# Altium PCB PCB_SPSU-v6.0.0.PcbDoc
Units mil, origin at the board's own origin, x right, y up, seen from the top; angles counter-clockwise.
Board outline 1757.74 x 2141.82 mil, 2 copper layers (Top Layer, Bottom Layer), stack 61.811 mil thick; 29 components, 18 nets, 100 pads, 208 vias.
Unrouted connection lines stored in the file: 4.
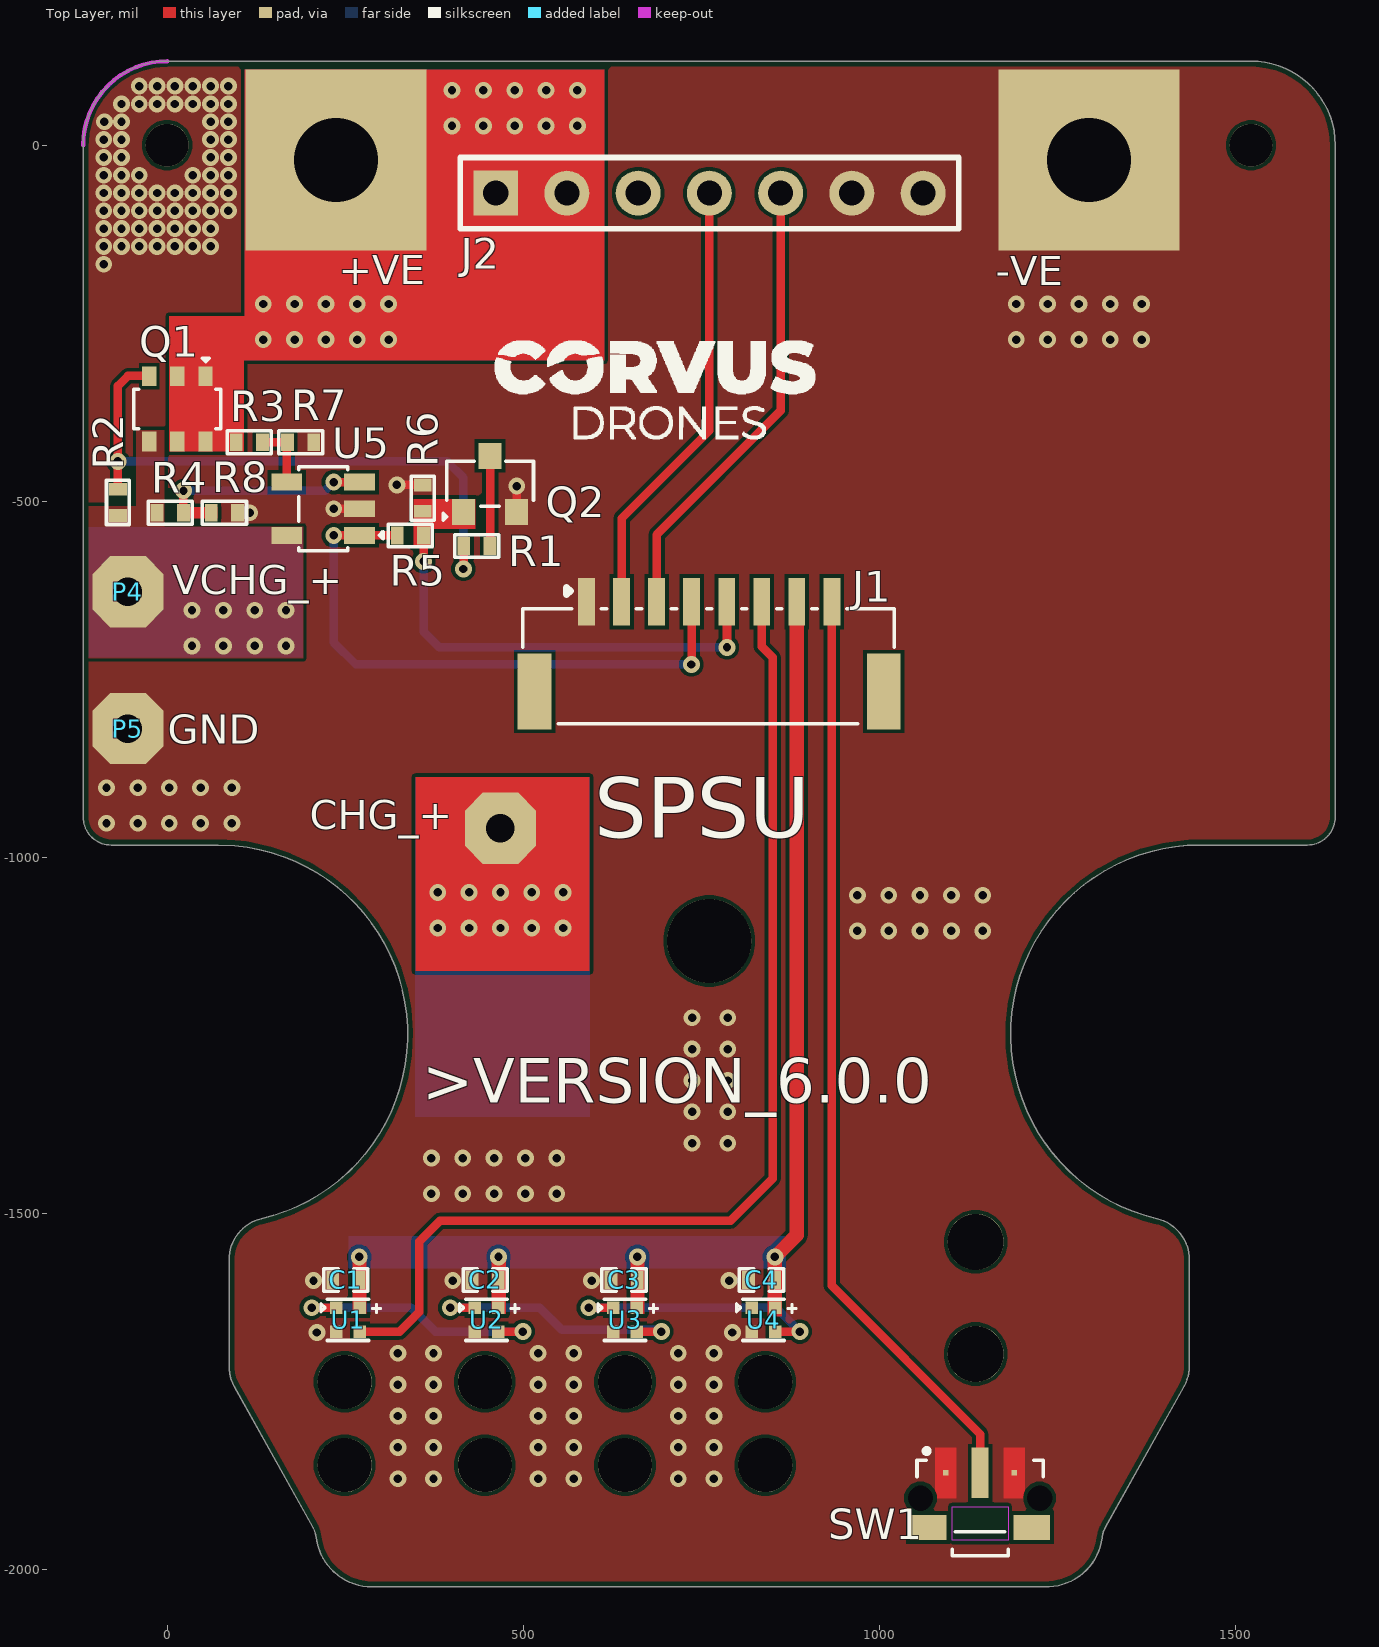
[diagram p0: Top Layer view]
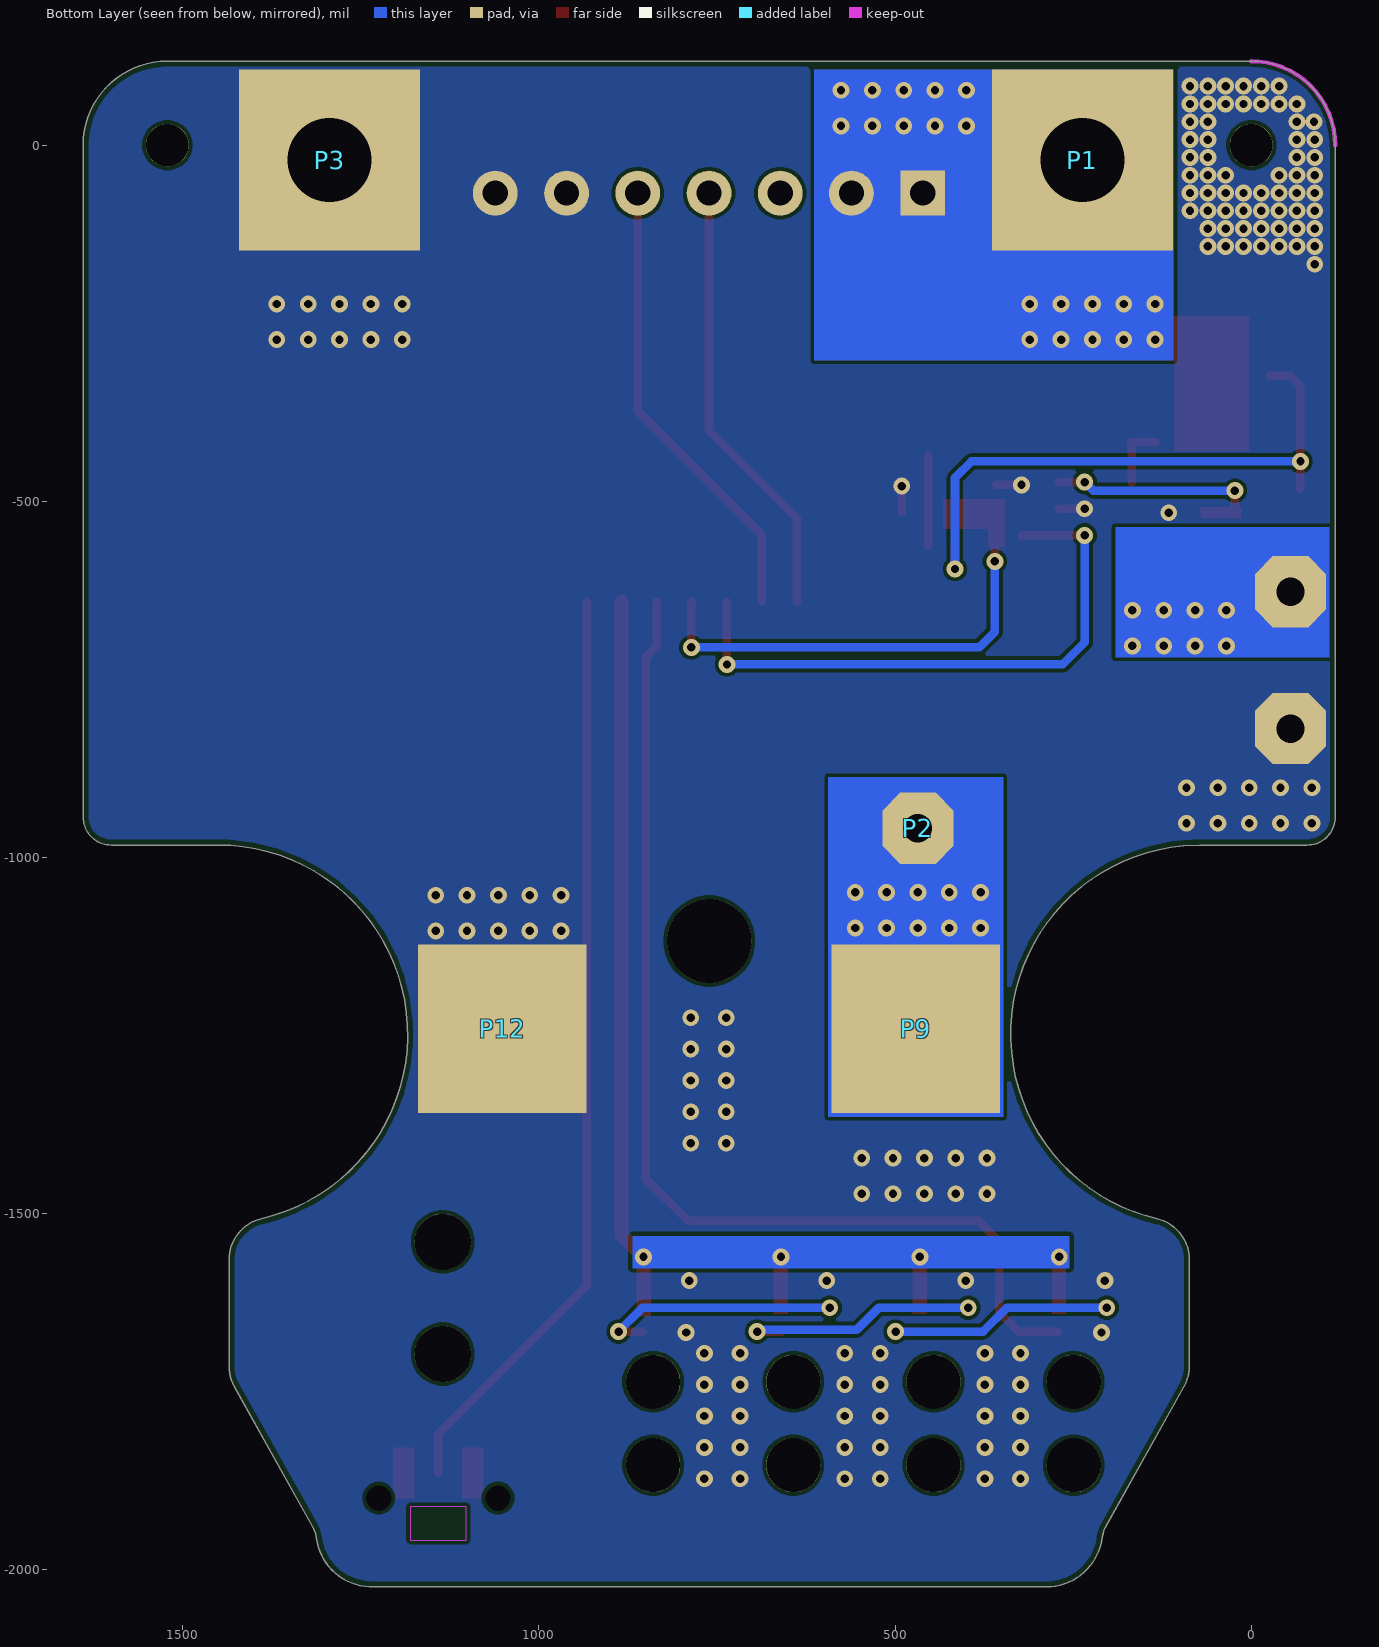
[diagram p1: Bottom Layer view, seen from below]
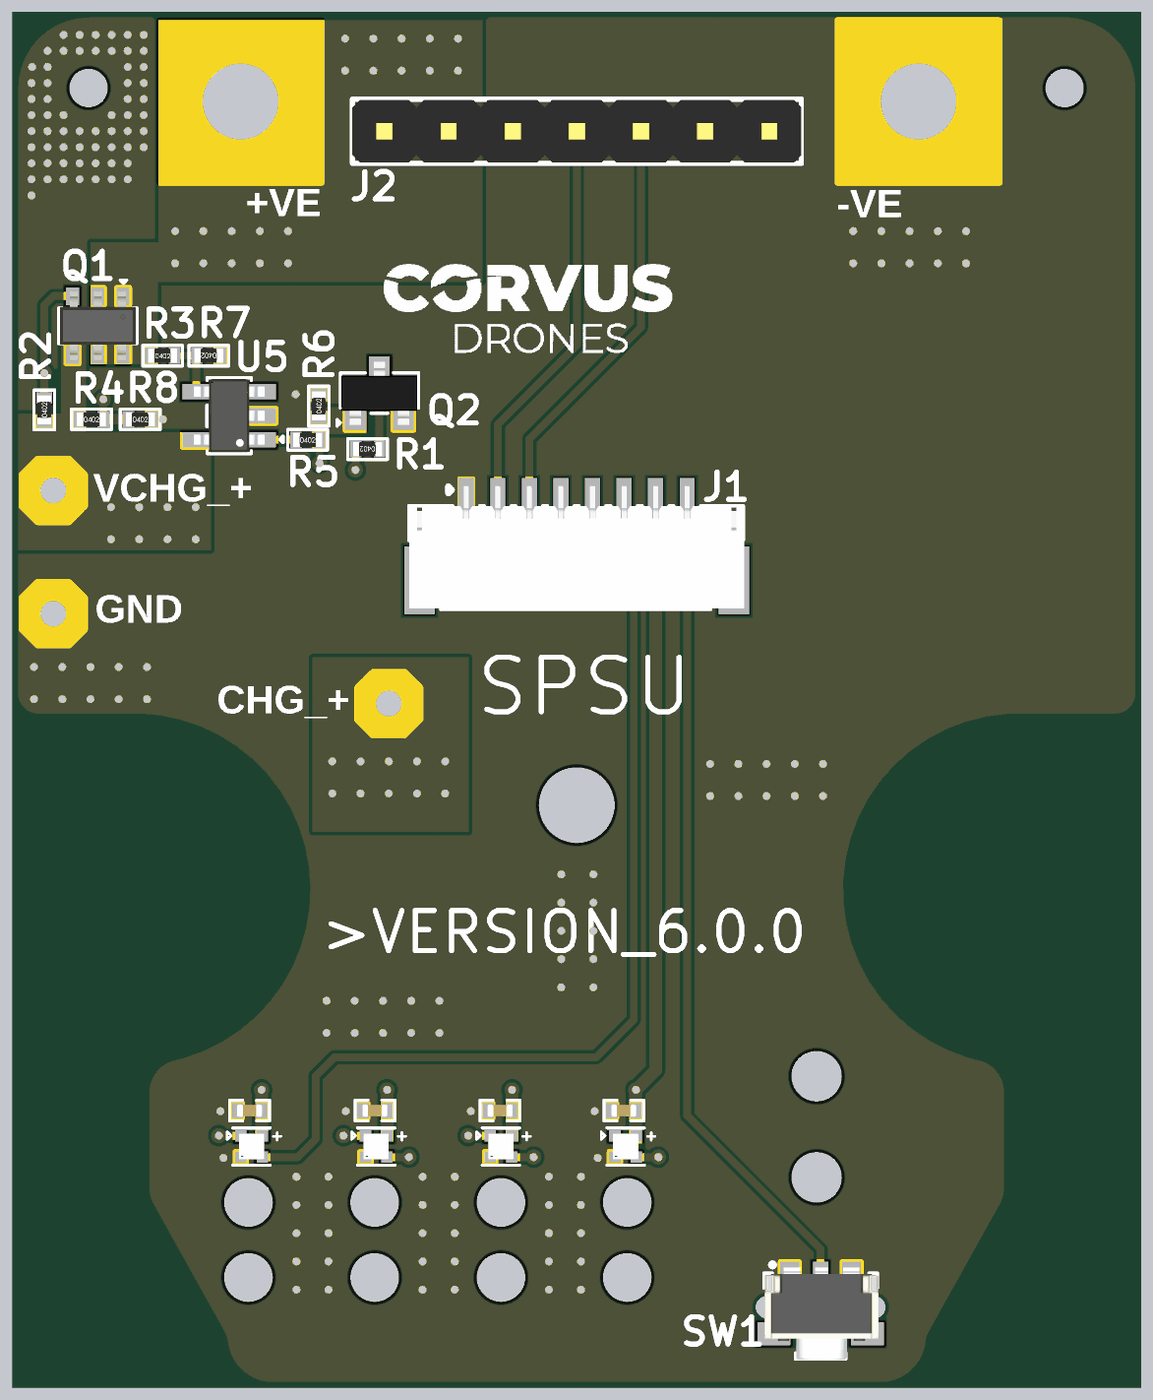
[diagram p2: 3D render of the assembled board from above, using the file's embedded part models]

## Layer stack, top to bottom
Top Solder: solder mask 0.3937, Solder Resist, Dk 3.5
Top Layer: signal copper 1.378
Dielectric 1: core 59.0551, FR-4, Dk 4.8
Bottom Layer: signal copper 1.378
Bottom Solder: solder mask 0.3937, Solder Resist, Dk 3.5

## Board outline
204.87,-1940.69 94.44,-1742.51 cw(c146.03,-1713.76) 86.97,-1713.76 86.97,-1564.54 cw(c146.02,-1564.54) 132.57,-1507.04 ccw(c72.05,-1248.28) 95.21,-983.54 72.05,-982.52 -78.47,-982.52 cw(c-78.47,-943.15) -117.84,-943.15 -117.84,-0.15 cw(c0.27,-0.14) -10.03,117.52 0.27,117.96 1521.79,117.96 cw(c1521.8,-0.15) 1639.46,10.15 1639.9,-0.15 1639.9,-943.15 cw(c1600.53,-943.15) 1603.97,-982.37 1600.53,-982.52 1450.01,-982.52 ccw(c1450.01,-1248.27) 1389.49,-1507.04 cw(c1376.04,-1564.54) 1435.09,-1564.54 1435.09,-1713.76 cw(c1376.03,-1713.76) 1427.62,-1742.51 1317.19,-1940.69 ccw(c1351.56,-1959.88) 1314.38,-1946.95 1313.4,-1950.24 1312.71,-1953.6 1312.52,-1954.94 cw(c1234.4,-1945.12) 1238.29,-2023.76 1234.39,-2023.86 287.67,-2023.86 cw(c287.67,-1945.12) 211.61,-1965.5 210.12,-1958.8 209.54,-1954.94 208.1,-1948.23 206.94,-1945 205.51,-1941.88

## Design rules (kind name [scope] priority, off if disabled: settings)
BoardOutlineClearance mdCopperDimension [All] p1: gap=10 ignorepadtopadclearanceinfootprint=FALSE except(0: Arc-SplitContinuation Track-SplitContinuation SMDPad-SplitContinuation THPad-SplitContinuation Via-SplitContinuation Fill-SplitContinuation Poly-SplitContinuation Region-SplitContinuation Text-SplitContinuation; 1: Arc-OutlineEdge Fill-OutlineEdge Text-OutlineEdge; 5: Track-OutlineEdge; 7.87: Poly-OutlineEdge Poly-CavityEdge Poly-CutoutEdge Poly-SplitBarrior)
Clearance [All] p1: gap=5 ignorepadtopadclearanceinfootprint=FALSE
HoleSize [All] p1: absolutevalues=TRUE maxlimit=99999 minlimit=11.8 maxpercent=80.000 minpercent=20.000
HoleToHoleClearance [All] p1: gap=6 allowstackedmicrovias=TRUE
MinimumSolderMaskSliver [All] p1: minsoldermaskwidth=0
PolygonConnect [All] p1: connectstyle=Direct reliefconductorwidth=10 reliefentries=4 polygonreliefangle="90 Angle" airgapwidth=10
RoutingVias [All] p1: holewidth=11.81 width=23.62 viastyle="Through Hole" minholewidth=11.81 minwidth=23.62 maxholewidth=100 maxwidth=100
SilkToSilkClearance [All] p1: silktosilkclearance=3
SilkToSolderMaskClearance [IsPad] p1: minsilkscreentomaskgap=0 clearancetoexposedcopper=TRUE
SolderMaskExpansion [All] p1: expansion=4 istentingtop=FALSE
UnRoutedNet [All] p1: checkbadconnections=TRUE
Width [All] p1: maxlimit=100 minlimit=5 preferedwidth=12 minimp=50.000000 maximp=50.000000 favimp=50.000000
24 further rules are at their usual default settings.

## Classes and differential pairs
component class "U_HMI Led's_Sheet": C1 C2 C3 C4 U1 U2 U3 U4
component class U_Power_Sheet: J1 J2 P1 P2 P3 P4 P5 P9 P12 Q1 Q2 R1 R2 R3 R4 R5 R6 R7 R8 SW1 U5

## Components (designator, comment, footprint, x,y, rotation, side; value= is the part's Value field where it differs from the comment)
C1 "100nF" cap-0402 251,-1593 r180 top
C2 "100nF" cap-0402 446.5,-1593 r180 top
C3 "100nF" cap-0402 641.5,-1593 r180 top
C4 "100nF" cap-0402 834.5,-1593 r180 top
J1 "SM08B-GHS-TB(LF)(SN)" SM08B-GHS-TB(LF)(SN) 761,-704 r0 top
J2 "PZ254V-11-07P" "HDR 1X7" 461.3,-67.31 r90 top locked
P1 "THT-Pad 6.5mm_3mm" "THT-Pad 6.5mm/Hole Size 3mm" 237,-21 r90 bottom
P2 "Wirepad 2.54/1.0" "Wirepad 2.54/1.0" 468,-959 r90 bottom
P3 "THT-Pad 6.5mm_3mm" "THT-Pad 6.5mm/Hole Size 3mm" 1294,-21 r90 bottom
P4 "Wirepad 2.54/1.0" "Wirepad 2.54/1.0" -55,-627 r180 top
P5 "Wirepad 2.54/1.0" "Wirepad 2.54/1.0" -55,-819 r180 top
P9 "SMD-Pad6mm" "6.0MM-SMD PAD" 471.02,-1240.44 r180 bottom locked
P12 "SMD-Pad6mm" "6.0MM-SMD PAD" 1051.58,-1240.44 r180 bottom locked
Q1 "IRLTS2242TRPBF" 6-TSOP_ 14.41,-370.23 r270 top value=55MR
Q2 "2N7002KT1G" SOT-23 453.4,-475.63 r0 top
R1 "10K" Res-0402 434.9,-562.6 r180 top
R2 "100K" Res-0402 -69,-501.5 r90 top
R3 "100K" Res-0402 115.5,-417 r0 top
R4 "100K" Res-0402 4.5,-516 r0 top
R5 "100K" Res-0402 341.5,-548 r0 top
R6 "100K" Res-0402 359,-495.5 r90 top
R7 "97.6K" Res-0402 187.5,-417 r180 top
R8 "100K" Res-0402 80.5,-516 r0 top
SW1 "TL3340AF160QG" TL3340AF160QG 1141.3,-1902.31 r0 top
U1 "XL-1010RGBC-WS2812B" XL-1010RGBC-WS2812B 254,-1649 r0 top
U2 "XL-1010RGBC-WS2812B" XL-1010RGBC-WS2812B 448.42,-1649 r0 top
U3 "XL-1010RGBC-WS2812B" XL-1010RGBC-WS2812B 642.85,-1649 r0 top
U4 "XL-1010RGBC-WS2812B" XL-1010RGBC-WS2812B 837.27,-1649 r0 top
U5 "TLV271IDBVR" SOT-23-5 219.18,-510.4 r180 top

## Footprints (in the part's own frame and the unit in brackets; to place one, negate y for a bottom-side part, rotate by r counter-clockwise, add the part's x,y. Pads: shape width x height; smd on the part's side, far side on the other; paste and mask are expansions set on the pad)
6-TSOP_ [mil]
  rect 27.52x20 smd: 1(-45.77,39.41) 2(-45.77,0) 3(-45.77,-39.41) 4(45.77,-39.41) 5(45.77,0) 6(45.77,39.41)
  silkscreen extent -71,-61 28,61, body extent -53,-59 53,59, height 39
"6.0MM-SMD PAD" [mm]
  rect 6x6 smd: 1(0,0)
cap-0402 [mil]
  rect 18x25 smd mask+2.36: 1(-18.5,0) 2(18.5,0)
  silkscreen extent -31,-16 31,16, body extent -20,-10 20,10, height 19
"HDR 1X7" [mm]
  rect 1.6x1.6 hole 0.9: 1(0,0)
  round 1.6 hole 0.9: 2(0,-2.54) 3(0,-5.08) 4(0,-7.62) 5(0,-10.16) 6(0,-12.7) 7(0,-15.24)
  silkscreen extent -1.27,-16.51 1.27,1.27, body extent -1.24,-16.51 1.25,1.27, height 8.74
Res-0402 [mil]
  rect 18x25 smd mask+2.17: 1(-18.5,0) 2(18.5,0)
  silkscreen extent -32,-17 32,16, body extent -23,-11 23,11, height 16
SM08B-GHS-TB(LF)(SN) [mm]
  rect 0.6x1.7 smd paste+0 mask+0.05: 1(-4.375,1.6) 2(-3.125,1.6) 3(-1.875,1.6) 4(-0.625,1.6) 5(0.625,1.6) 6(1.875,1.6) 7(3.125,1.6) 8(4.375,1.6)
  rect 1.21x2.7 smd paste+0 mask+0.05: MP1(-6.225,-1.6) MP2(6.225,-1.6)
  silkscreen extent -6.65,-2.75 6.6,2.11, body extent -6.63,-2.7 6.63,2.15, height 4.35
SOT-23 [mm] "TRANS NPN 40V 0.6A SOT23"
  rect 0.82x0.92 smd: 1(-0.95,-1) 2(0.95,-1) 3(0,1)
  silkscreen extent -1.68,-1.3 1.55,0.81, body extent -1.5,-1.25 1.5,1.25, height 1.05
SOT-23-5 [mm]
  rect 1.1x0.6 smd: 1(-1.3,0.95) 2(-1.3,0) 3(-1.3,-0.95) 4(1.3,-0.95) 5(1.3,0.95)
  silkscreen extent -2.13,-1.5 0.88,1.5, body extent -1.4,-1.45 1.4,1.45, height 1.45
"THT-Pad 6.5mm/Hole Size 3mm" [mil]
  rect 254x254 hole 118.11: 1(0,0)
TL3340AF160QG [mm]
  rect 0.2x0.2 smd paste-1 mask+0: 1(-1.225,0.975) 1(-1.225,0.975) 3(1.225,0.975) 3(1.225,0.975)
  rect 0.6x1.8 smd: 2(0,0.975)
  rect 1.3x0.9 smd: S1(-1.85,-0.975) S2(1.85,-0.975)
  round 0 hole 0.9 unplated: ""(-2.125,0.075) ""(2.125,0.075)
  Top Layer region: -0.85,0.075 -1.525,0.075 -1.525,0.084 -1.525,0.102 -1.526,0.12 -1.529,0.138 -1.53,0.146 -1.53,0.146 -1.531,0.155 -1.533,0.173 -1.536,0.191 -1.54,0.209 -1.543,0.218 -1.545,0.228 -1.551,0.25 -1.557,0.271 -1.565,0.292 -1.569,0.302 -1.572,0.311 -1.579,0.327 -1.587,0.343 -1.595,0.358 -1.6,0.365 -1.6,0.375 -1.6,1.875 -0.85,1.875
  Top Layer region: 1.6,0.375 1.6,0.365 1.595,0.358 1.587,0.343 1.579,0.327 1.572,0.311 1.569,0.302 1.565,0.292 1.557,0.271 1.551,0.25 1.545,0.228 1.543,0.218 1.54,0.209 1.536,0.191 1.533,0.173 1.531,0.155 1.53,0.146 1.53,0.146 1.529,0.138 1.526,0.12 1.525,0.102 1.525,0.084 1.525,0.075 0.85,0.075 0.85,1.875 1.6,1.875
  Keep-Out Layer region: 1,-1.425 -1,-1.425 -1,-0.225 1,-0.225
  silkscreen extent -2.25,-1.97 2.25,1.8, body extent -2.21,-2.01 2.29,1.65, height 3.21
"Wirepad 2.54/1.0" [mil]
  oct 100x100 hole 40: 1(0,0)
XL-1010RGBC-WS2812B [mm]
  rect 0.45x0.45 smd: 1(-0.425,0.425) 2(0.425,0.425) 3(-0.425,-0.425) 4(0.425,-0.425)
  silkscreen extent -0.97,-0.74 1.17,0.74, body extent -0.5,-0.5 0.5,0.5, height 0.81

## Part data
C1 C2 C3 C4: library part C1005X7R1H104KT000F, "CAP CER 0.1UF 50V X7R 0402", Dielectric=X7R, LCSC Part Number=C361198, MAnufacturer=TDK, Tolerance=10%, Voltage=25V, Category="Ceramic Capacitors", ComponentLink1Description=LCSC, ComponentLink1URL=https://www.lcsc.com/product-detail/Multilayer-Ceramic-Capacitors-MLCC-SMD-SMT_TDK-C1005X7R1H104KT000F_C361198.html, Item Type=Capacitor, Manufacturer Part Number=C1005X7R1H104KT000F, RoHS=No, Supplier 1=Avnet, Supplier Part Number 1=C1005X7R1H104KT000F
J1: "CONN HEADER SMD R/A 8POS 1.25MM", Current Rating=1A, Flammability Rating="UL94 V-0", Housing Color=50Colour, Insulation Color=Natural, LCSC Part Number=C265111, MAnufacturer=JST, Voltage Rating=50V, ComponentLink1Description=https://datasheet.ciiva.com/25617/0900766b810cef18-25617249.pdf?src-supplier=Rs, ComponentLink1URL=https://datasheet.ciiva.com/25617/0900766b810cef18-25617249.pdf?src-supplier=Rs, ComponentLink2Description=https://datasheet.ciiva.com/16290/jst20sm08b-ghs-tb-lf-sn-16290511.pdf?src-supplier=Future+Electronics, ComponentLink2URL=https://datasheet.ciiva.com/16290/jst20sm08b-ghs-tb-lf-sn-16290511.pdf?src-supplier=Future+Electronics, Connector type=Header, Contact Finish - Mating=TIN, Contact Material=Bronze, Contact Shape=Rectangular, Contact Type="Outer Shroud Contact", Fastening Type=Ramp, Housing Material=4261ConductorMaterial, Insulation Material=Nylon, Item Type=Connectors, Lead Free=5697LeadFree, Manufacturer Part Number=SM08B-GHS-TB(LF)(SN), Mounting Technology="Surface Mount", Number of Contacts=8, Number of Positions=8, Number of Rows=1, Orientation="Right Angle", Packaging="Cut Tape", Pitch=1.25mm, Pricing="2500=0.3128, 5000=0.3063 (USD)", RoHS=Yes, Series=GH, Stock=5000, Supplier="Arrow Electronics", Termination=Solder
J2: "DNP", LCSC Part Number=C492406, MAnufacturer=XFCN, Package=2.54mm, ComponentLink1Description=LCSC, ComponentLink1URL=https://www.lcsc.com/product-detail/Pin-Headers_XFCN-PZ254V-11-07P_C492406.html, Item Type=Header, Manufacturer Part Number=PZ254V-11-07P
P1 P3: library part "THT-Pad 6.5mm/Hole Size 3mm"
Q1: "MOSFET P-CH 20V 6.9A 6TSOP", Drain to Source Breakdown Voltage=-20V, Drain to Source Resistance=26mR, LCSC Part Number=C538190, MAnufacturer=Infineon, On-State Resistance=-32mR, Package Quantity=3000NUMBER, Power Dissipation=2W, ComponentLink1Description=http://www.farnell.com/datasheets/1911990.pdf?src-supplier=Farnell, ComponentLink1URL=http://www.farnell.com/datasheets/1911990.pdf?src-supplier=Farnell, ComponentLink2Description=http://www.farnell.com/datasheets/1911990.pdf?src-supplier=Element14, ComponentLink2URL=http://www.farnell.com/datasheets/1911990.pdf?src-supplier=Element14, ComponentLink3Description=https://datasheet.octopart.com/IRLTS2242TRPBF-Infineon-datasheet-41193307.pdf?src-supplier=Newark, ComponentLink3URL=https://datasheet.octopart.com/IRLTS2242TRPBF-Infineon-datasheet-41193307.pdf?src-supplier=Newark, ComponentLink4Description=https://www.infineon.com/dgdl/irlts2242pbf.pdf?fileId=5546d462533600a401535671e9a12718&src-supplier=Digikey, ComponentLink4URL=https://www.infineon.com/dgdl/irlts2242pbf.pdf?fileId=5546d462533600a401535671e9a12718&src-supplier=Digikey, ComponentLink5Description=https://datasheet.octopart.com/IRLTS2242TRPBF-Infineon-datasheet-11534477.pdf?src-supplier=Farnell, ComponentLink5URL=https://datasheet.octopart.com/IRLTS2242TRPBF-Infineon-datasheet-11534477.pdf?src-supplier=Farnell, Element Configuration=5460ElementConfiguration, Fall Time=68ns, Height=1.3mm, Item Type=MOSFETs, Length=3mm, Manufacturer Part Number=IRLTS2242TRPBF, Number of Channels=1NUMBER, Number of Elements=1NUMBER, Pricing="1=0.44, 10=0.372, 50=0.372, 100=0.259, 1000=0.164, 10000=0.129 (USD)", Radiation Hardening=5898YesNo, RoHS=Yes, Stock=67736, Supplier=Mouser, Turn-Off Delay Time=18ns, Turn-On Delay Time=5.8ns, Width=1.75mm
Q2: "MOSFET N-CH 60V 320MA SOT23-3", Case/Package=SOT-23-3, Continuous Drain Current (ID)=320mA, Drain to Source Breakdown Voltage=60V, Drain to Source Resistance=1.6R, Gate to Source Voltage (Vgs)=20V, Input Capacitance=24.5pF, LCSC Part Number=C116584, MAnufacturer="ON Semiconductor", Max Operating Temperature=150°C, Max Power Dissipation=420mW, Min Operating Temperature=-55°C, Package Quantity=1, Power Dissipation=300mW, Supplier Part Number=3445699, Threshold Voltage=2.3V, Category=MOSFETs, ComponentLink1Description=https://datasheet.ciiva.com/1254/2n7002k-d-1254499.pdf?src-supplier=Newark, ComponentLink1URL=https://datasheet.ciiva.com/1254/2n7002k-d-1254499.pdf?src-supplier=Newark, ComponentLink2Description=https://datasheet.ciiva.com/16220/2n7002k-d-16220919.pdf?src-supplier=Future+Electronics, ComponentLink2URL=https://datasheet.ciiva.com/16220/2n7002k-d-16220919.pdf?src-supplier=Future+Electronics, ComponentLink3Description=https://datasheet.ciiva.com/936/2n7002k-d-936793.pdf?src-supplier=Digikey, ComponentLink3URL=https://datasheet.ciiva.com/936/2n7002k-d-936793.pdf?src-supplier=Digikey, Contact Plating=Tin,Matte, Drain-source On Resistance-Max=1.6R, Element Configuration=Single, Fall Time=9ns, Halogen Free="Halogen Free", Height=1.01mm, Item Type=MOSFET, Lead Free="Lead Free", Length=3.04mm, Manufacturer Part Number=2N7002KT1G, Nominal Vgs=2.3V, Number of Channels=1NUMBER, Number of Elements=1, Packaging="Tape and Reel", Pins=3, Polarity=N-CHANNEL, Pricing="3000=0.0238, 12000=0.0228, 45000=0.0218, 75000=0.0215, 150000=0.0204 (USD)", Radiation Hardening=No, Rds On Max=1.6R, Reach SVHC Compliant=No, Rise Time=9ns, RoHS=Yes, RoHS Compliant=Yes, Series=-, Stock=51000, Supplier="Future Electronics", Turn-Off Delay Time=55.8ns, Turn-On Delay Time=12.2ns, Width=1.4mm
R1: library part RC0402FR-0710KL, "RES 10K OHM 1% 1/16W 0402", Case Code (Imperial)=0402, Case Code (Metric)=1005, LCSC Part Number=C60490, MAnufacturer=Yageo, Max Operating Temperature=155°C, Max Power Dissipation=63mW, Min Operating Temperature=-55°C, Power Rating=62.5mW, Resistance=10kR, Resistance Tolerance=1%, Resistor Type="Thick Film", Supplier Part Number 1=603-RC0402FR-0710KL, Temperature Coefficient=100ppm/°C, Voltage Rating=50V, Case/Package=0402, Category="Chip SMD Resistors", ComponentLink1Description=https://datasheet.ciiva.com/7660/38568-7660787.pdf?src-supplier=Element14, ComponentLink1URL=https://datasheet.ciiva.com/7660/38568-7660787.pdf?src-supplier=Element14, ComponentLink2Description=https://datasheet.ciiva.com/7849/1686128-7849814.pdf?src-supplier=Element14, ComponentLink2URL=https://datasheet.ciiva.com/7849/1686128-7849814.pdf?src-supplier=Element14, ComponentLink3Description=https://datasheet.ciiva.com/7983/1018594-7983486.pdf?src-supplier=Element14, ComponentLink3URL=https://datasheet.ciiva.com/7983/1018594-7983486.pdf?src-supplier=Element14, ComponentLink4Description=https://datasheet.ciiva.com/22747/1018594-22747512.pdf?src-supplier=Element14, ComponentLink4URL=https://datasheet.ciiva.com/22747/1018594-22747512.pdf?src-supplier=Element14, ComponentLink5Description=https://datasheet.ciiva.com/12667/pyu-rc0402-51-rohs-l-6-r-12667067.pdf?src-supplier=Mouser, ComponentLink5URL=https://datasheet.ciiva.com/12667/pyu-rc0402-51-rohs-l-6-r-12667067.pdf?src-supplier=Mouser, ComponentLink6Description=https://datasheet.ciiva.com/7849/1784430-7849813.pdf?src-supplier=Element14, ComponentLink6URL=https://datasheet.ciiva.com/7849/1784430-7849813.pdf?src-supplier=Element14, ComponentLink7Description=https://datasheet.ciiva.com/7849/1784430-7849815.pdf?src-supplier=Element14, ComponentLink7URL=https://datasheet.ciiva.com/7849/1784430-7849815.pdf?src-supplier=Element14, Construction=Rectangular, Depth=0.5mm, Features="Moisture Resistant", Height=0.32mm, Item Type=Resistor, Lead Free="Lead Free", Lead Pitch=0.2mm, Length=1mm, Manufacturer Part Number=RC0402FR-0710KL, Military Standard=Not, Number of Pins=2, Number of Terminations=2, Packaging="Tape and Reel", Pricing 1="1=0.10000, 10=0.01400, 50=0.01400, 100=0.00500, 1000=0.00300, 10000=0.00200 (USD)", REACH SVHC="No SVHC", RoHS=Yes, RoHS Compliant=Yes, Series=RC, Stock 1=18648329, Supplier 1=Mouser, Termination=SMD/SMT, Tolerance=1%, Voltage Rating (DC)=50V, Width=0.5mm, Working Voltage=50V
R2 R3 R4 R5 R6 R8: library part RC0402FR-07100KL, "RES 100K OHM 1% 1/16W 0402", Case Code (Imperial)=0402, Case Code (Metric)=1005, LCSC Part Number=C60491, MAnufacturer=Yageo, Max Operating Temperature=155°C, Max Power Dissipation=63mW, Min Operating Temperature=-55°C, Package Quantity=1, Resistance=100kR, Resistance Tolerance=1%, Resistor Type="Thick Film", Supplier Part Number 1=603-RC0402FR-07100KL, Temperature Coefficient=100ppm/°C, Voltage Rating=50V, Case/Package=0402, Category="Chip SMD Resistors", ComponentLink1Description=https://datasheet.ciiva.com/11819/0900766b80c66297-11819452.pdf?src-supplier=RSComponents, ComponentLink1URL=https://datasheet.ciiva.com/11819/0900766b80c66297-11819452.pdf?src-supplier=RSComponents, ComponentLink2Description=https://datasheet.ciiva.com/22747/1018594-22747509.pdf?src-supplier=Element14, ComponentLink2URL=https://datasheet.ciiva.com/22747/1018594-22747509.pdf?src-supplier=Element14, ComponentLink3Description=https://datasheet.ciiva.com/2453/pyu-r-int-thick-7-2453362.pdf?src-supplier=Digi-Key, ComponentLink3URL=https://datasheet.ciiva.com/2453/pyu-r-int-thick-7-2453362.pdf?src-supplier=Digi-Key, ComponentLink4Description=https://datasheet.ciiva.com/2453/pyu-r-int-thick-7-2453363.pdf?src-supplier=Digi-Key, ComponentLink4URL=https://datasheet.ciiva.com/2453/pyu-r-int-thick-7-2453363.pdf?src-supplier=Digi-Key, ComponentLink5Description=https://datasheet.ciiva.com/2453/pyu-r-int-thick-7-2453361.pdf?src-supplier=Digi-Key, ComponentLink5URL=https://datasheet.ciiva.com/2453/pyu-r-int-thick-7-2453361.pdf?src-supplier=Digi-Key, ComponentLink6Description=https://datasheet.ciiva.com/12667/pyu-rc0402-51-rohs-l-6-r-12667930.pdf?src-supplier=Mouser, ComponentLink6URL=https://datasheet.ciiva.com/12667/pyu-rc0402-51-rohs-l-6-r-12667930.pdf?src-supplier=Mouser, ComponentLink7Description=https://datasheet.ciiva.com/15189/getdatasheetpartid-323696-15189334.pdf?src-supplier=Verical, ComponentLink7URL=https://datasheet.ciiva.com/15189/getdatasheetpartid-323696-15189334.pdf?src-supplier=Verical, Construction=Rectangular, Depth=0.5mm, Features="Moisture Resistant", Height=0.016inch, Item Type=Resistor, Lead Free="Lead Free", Length=0.039inch, Manufacturer Part Number=RC0402FR-07100KL, Military Standard=Not, Number of Terminations=2, Packaging="Tape and Reel", Power Rating=63mW, Pricing 1="1=0.10000, 10=0.01200, 50=0.01200, 100=0.00500, 1000=0.00300, 2500=0.00200, 10000=0.00100 (USD)", REACH SVHC="No SVHC", RoHS=Yes, RoHS Compliant=Yes, Series=RC, Stock 1=7759549, Supplier 1=Mouser, Technology="THICK FILM", Termination=SMD/SMT, Tolerance=1%, Width=0.02inch, Working Voltage=50V
R7: library part RT0402BRD0797K6L, "RES SMD 97.6KOHM 0.1% 1/16W 0402", LCSC Part Number=C852964, MAnufacturer=Yageo, Voltage Rating (DC)=50V, ComponentLink1Description=https://datasheet.ciiva.com/2582/pyu-rt-1-to-0-05-rohs-l-5-2582537.pdf?src-supplier=Digikey, ComponentLink1URL=https://datasheet.ciiva.com/2582/pyu-rt-1-to-0-05-rohs-l-5-2582537.pdf?src-supplier=Digikey, Item Type=Resistors, Lead Free=5697LeadFree, Manufacturer Part Number=RT0402BRD0797K6L, Pricing="1=0.0267, 10=0.0191, 25=0.0164, 100=0.0148, 250=0.0132 (USD)", RoHS=Yes, Stock=301, Supplier="Arrow Electronics"
SW1: "Switch Tactile N.O. SPST Round Button Gull Wing 0.05A 12VDC 100000Cycles 1.57N SMD", Case/Package=SMD/SMT, Color=White, Contact Current Rating=50mA, Contact Resistance=500mR, MAnufacturer=E-Switch, Max Operating Temperature=85°C, Max Voltage Rating (DC)=12V, Min Operating Temperature=-35°C, Operating Force=160gf, Package Quantity=1, Supplier Part Number=9232661, Actuator Length=0.85mm, Actuator Material=Polyphthalamide, Actuator Type=Standard, Category="Tactile Switches", ComponentLink1Description=https://datasheet.ciiva.com/7637/tl3340-7637667.pdf?src-supplier=Element14, ComponentLink1URL=https://datasheet.ciiva.com/7637/tl3340-7637667.pdf?src-supplier=Element14, ComponentLink2Description=https://datasheet.ciiva.com/5284/tl3340-28153-5284108.pdf?src-supplier=Mouser, ComponentLink2URL=https://datasheet.ciiva.com/5284/tl3340-28153-5284108.pdf?src-supplier=Mouser, ComponentLink3Description=https://datasheet.ciiva.com/2900/p021301b-2900825.pdf?src-supplier=Digikey, ComponentLink3URL=https://datasheet.ciiva.com/2900/p021301b-2900825.pdf?src-supplier=Digikey, ComponentLink4Description=https://datasheet.ciiva.com/2900/p021301b-2900826.pdf?src-supplier=Digikey, ComponentLink4URL=https://datasheet.ciiva.com/2900/p021301b-2900826.pdf?src-supplier=Digikey, ComponentLink5Description=https://datasheet.ciiva.com/2900/p021301b-2900827.pdf?src-supplier=Digikey, ComponentLink5URL=https://datasheet.ciiva.com/2900/p021301b-2900827.pdf?src-supplier=Digikey, Contact Material="Stainless Steel,Silver", Contact Plating="Stainless Steel,Silver", Current Rating=50mA, Electrical Life=100000Cycles, Height=3.55mm, Housing Material=Polyphthalamide, Illumination Type=Non-Illuminated,Illuminated, Lead Free=5697LeadFree, Manufacturer Part Number=TL3340AF160QG, Mechanical Life=100000Cycles, Mounting Technology="Surface Mount", Number of Positions=2NUMBER, Orientation="Right Angle", Packaging="Tape and Reel", Pricing="2000=0.27 (USD)", Reach SVHC Compliant=No, RoHS=Yes, RoHS Compliant=Yes, Series=TL3340, Size=3.3mm, Stock=16000, Supplier="Future Electronics", Switch Function=Off-Mom, Switch Travel=0.2mm, Termination="Gull Wing", Throw Configuration=SPST, Voltage Rating (DC)=12V
U1 U2 U3 U4: "Colorless transparence -40℃~+150℃ 正贴 RGB 120° 1010 Light Emitting Diodes (LED) ROHS", LCSC Part Number=C5349953, MAnufacturer=XINGLIGHT, Package=1010, ComponentLink1Description=LCSC, ComponentLink1URL=https://www.lcsc.com/product-detail/span-style-background-color-ff0-RGB-span-LEDs-Built-in-IC_XINGLIGHT-XL-1010RGBC-WS2812B_C5349953.html, Item Type="RGB LED", Manufacturer Part Number=XL-1010RGBC-WS2812B
U5: "IC CMOS 1 CIRCUIT SOT23-5", LCSC Part Number=C181500, MAnufacturer="Texas Instruments", ComponentLink1Description=https://datasheet.ciiva.com/7848/1772259-7848320.pdf?src-supplier=Element14, ComponentLink1URL=https://datasheet.ciiva.com/7848/1772259-7848320.pdf?src-supplier=Element14, ComponentLink2Description=https://datasheet.ciiva.com/1796/tlv271-1796326.pdf?src-supplier=Digikey, ComponentLink2URL=https://datasheet.ciiva.com/1796/tlv271-1796326.pdf?src-supplier=Digikey, ComponentLink3Description=https://datasheet.ciiva.com/1796/tlv271-1796327.pdf?src-supplier=Digikey, ComponentLink3URL=https://datasheet.ciiva.com/1796/tlv271-1796327.pdf?src-supplier=Digikey, ComponentLink4Description=https://datasheet.ciiva.com/1796/tlv271-1796328.pdf?src-supplier=Digikey, ComponentLink4URL=https://datasheet.ciiva.com/1796/tlv271-1796328.pdf?src-supplier=Digikey, ComponentLink5Description=https://datasheet.ciiva.com/2974/slos351d-2974433.pdf?src-supplier=Avnet, ComponentLink5URL=https://datasheet.ciiva.com/2974/slos351d-2974433.pdf?src-supplier=Avnet, ComponentLink6Description=https://datasheet.ciiva.com/2974/slos351d-2974434.pdf?src-supplier=Avnet, ComponentLink6URL=https://datasheet.ciiva.com/2974/slos351d-2974434.pdf?src-supplier=Avnet, ComponentLink7Description=https://datasheet.ciiva.com/46383/1882561-46383869.pdf?src-supplier=Element14, ComponentLink7URL=https://datasheet.ciiva.com/46383/1882561-46383869.pdf?src-supplier=Element14, Item Type=Opam, Manufacturer Part Number=TLV271IDBVR, Pricing="1=0.9, 10=0.761, 50=0.761, 100=0.585, 1000=0.408, 10000=0.347 (USD)", RoHS=Yes, Stock=23196, Supplier=Mouser

## Free pads (board coordinates)
  round 75.98 hole 75.98 unplated: MH1(839.77,-1853) MH2(839.77,-1736.07) MH3(249.22,-1736.07) MH4(249.22,-1853) MH5(446.07,-1736.07) MH6(642.92,-1853) MH7(642.92,-1736.07) MH8(446.07,-1853)
  round 78.74 hole 78.74 unplated: MH9(1135.05,-1539.52) MH10(1135.05,-1697)
  round 60 hole 60 unplated: MH11(0,0) MH12(1521.68,-0.11)
  round 118.11 hole 118.11 unplated: MH13(761.03,-1117.17)

## Via types
v1: diameter 23.62, hole 11.81, Top Layer to Bottom Layer, tented both sides, 208 vias

## Nets (pads, with @x,y where several pads share a name; then routed paths per layer and width w, separated by ;. In a path a pad name is that pad's centre, name@x,y a point inside that pad or via, vN(x,y) a via of type N, cw(c..) or ccw(c..) an arc to the next point about the centre after c; other vN are vias at no path point)
+5V_ESC: C1.1 C2.1 C3.1 C4.1 J1.7 U1.2 U2.2 U3.2 U4.2 | length 1004
  Top Layer w20: U4.2@853,-1632.27 C4.1 v1@853,-1560.73 ; v1(853.23,-1560.73) 884.03,-1529.93 J1.7
  other v1: 269.73,-1560.73 465.23,-1560.73 660.23,-1560.73
+Vref: R4.2 R8.1 U5.3 | length 283.3
  Top Layer w12: R4.2 v1(23,-485) ; v1(234,-473) U5.3
  Bottom Layer w12: v1(23,-485) 222,-485 v1(234,-473)
CH_EN: J1.4 R5.1 U5.1 | length 842.7
  Top Layer w12: v1(234,-547.8) U5.1 321.8,-547.8 R5.1@323,-549 ; v1(736,-729) 736.39,-728.61 J1.4
  Bottom Layer w12: v1(234,-547.8) 234,-698 265,-729 v1(736,-729)
DIN#: J1.6 U1.4 | length 1542.5
  Top Layer w12: U1.4 326.27,-1665.73 354,-1638 354,-1539 383,-1510 791,-1510 850,-1451 850,-719 834.81,-703.81 J1.6
DOUT1: U1.1 U2.4 | length 378.7
  Top Layer w12: v1(203,-1632) 203.27,-1632.27 U1.1 ; U2.4 v1@499.15,-1665.73
  Bottom Layer w12: v1(203,-1632) 343,-1632 376.46,-1665.46 v1(499.42,-1665.46)
DOUT2: U2.1 U3.4 | length 378.3
  Top Layer w12: v1@397.69,-1632.27 U2.1 ; U3.4 v1@693.58,-1665.73
  Bottom Layer w12: v1(397.42,-1632) 523,-1632 554,-1663 691.38,-1663 v1(693.85,-1665.46)
DOUT3: U3.1 U4.4 | length 378.3
  Top Layer w12: v1@592.11,-1632.27 U3.1 ; U4.4 v1@888,-1665.73
  Bottom Layer w12: v1(591.85,-1632) 854.8,-1632 v1(888.27,-1665.46)
Gate_CHG+: Q1.3 R1.2 R2.2 | length 849.5
  Top Layer w12: R2.2 v1(-69,-444) -69,-338 -55,-324 -25.46,-324 Q1.3 ; v1@416.4,-594.6 R1.2
  Bottom Layer w12: v1(-69,-444) 393,-444 416,-467 v1(416,-595)
GND: C1.2 C2.2 C3.2 C4.2 J1.1 J2.6 J2.7 P3.1 P5.1 P12.1 Q2.2 R6.2 R7.1 R8.2 SW1.1 SW1.3 U1.3 U2.3 U3.3 U4.3 U5.2 | length 109.1
  Top Layer w12: v1(234,-510.4) U5.2 ; v1(322.64,-477) R6.2 ; Q2.2 v1(490.8,-478.64)
  other v1: 324,-1872 374,-1872 520.85,-1872 570.85,-1872 717.7,-1872 767.7,-1872 324,-1828 374,-1828 520.85,-1828 570.85,-1828 717.7,-1828 767.7,-1828 324,-1784 374,-1784 520.85,-1784 570.85,-1784 717.7,-1784 767.7,-1784 324,-1740 374,-1740 520.85,-1740 570.85,-1740 717.7,-1740 767.7,-1740 324,-1696 374,-1696 520.85,-1696 570.85,-1696 717.7,-1696 767.7,-1696 210.27,-1666.73 793.54,-1666.73 205.5,-1594 401,-1594 596,-1594 789,-1594 371,-1472 415,-1472 459,-1472 503,-1472 547,-1472 371,-1422 415,-1422 459,-1422 503,-1422 547,-1422 737,-1401 787,-1401 737,-1357 787,-1357 737,-1313 787,-1313 737,-1269 787,-1269 737,-1225 787,-1225 969,-1103 1013,-1103 1057,-1103 1101,-1103 1145,-1103 969,-1053 1013,-1053 1057,-1053 1101,-1053 1145,-1053 -85,-952 -41,-952 3,-952 47,-952 91,-952 -85,-902 -41,-902 3,-902 47,-902 91,-902 116,-516 1192,-273 1236,-273 1280,-273 1324,-273 1368,-273 1192,-223 1236,-223 1280,-223 1324,-223 1368,-223 -88.97,-167.17 -88.97,-142.17 -63.97,-142.17 -38.97,-142.17 -13.97,-142.17 11.03,-142.17 36.03,-142.17 61.03,-142.17 -88.97,-117.17 -63.97,-117.17 -38.97,-117.17 -13.97,-117.17 11.03,-117.17 36.03,-117.17 61.03,-117.17 -88.97,-92.17 -63.97,-92.17 -38.97,-92.17 -13.97,-92.17 11.03,-92.17 36.03,-92.17 61.03,-92.17 86.03,-92.17 -88.97,-67.17 -63.97,-67.17 -38.97,-67.17 -13.97,-67.17 11.03,-67.17 36.03,-67.17 61.03,-67.17 86.03,-67.17 -88.97,-42.17 -63.97,-42.17 -38.97,-42.17 36.03,-42.17 61.03,-42.17 86.03,-42.17 -88.97,-17.17 -63.97,-17.17 61.03,-17.17 86.03,-17.17 -88.97,7.83 -63.97,7.83 61.03,7.83 86.03,7.83 -87.97,32.83 -63.97,32.83 61.03,32.83 86.03,32.83 -63.97,57.83 -38.97,57.83 -13.97,57.83 11.03,57.83 36.03,57.83 61.03,57.83 86.03,57.83 -38.97,82.83 -13.97,82.83 11.03,82.83 36.03,82.83 61.03,82.83 86.03,82.83
GPIO18: J1.5 Q2.1 R5.2 R6.1 | length 634.3
  Top Layer w12: v1(360,-584.36) R5.2 ; J1.5 786,-641.41 v1(786,-705)
  Bottom Layer w12: v1(360,-584.36) 360,-683 382,-705 v1(786,-705)
NetP2_1: P2.1 P9.1
  other v1: 380,-1099 424,-1099 468,-1099 512,-1099 556,-1099 380,-1049 424,-1049 468,-1049 512,-1049 556,-1049
NetQ2_3: Q2.3 R1.1 | length 126.3
  Top Layer w12: R1.1 Q2.3
NetR3_2: R3.2 R7.2 U5.4 | length 91.4
  Top Layer w12: R3.2 R7.2 168,-418 U5.4
SCL: J1.3 J2.5 | length 645.8
  Top Layer w12: J1.3 687.18,-546.82 861.3,-372.7 J2.5
SDA: J1.2 J2.4 | length 624.8
  Top Layer w12: J1.2 637.96,-524.04 761.3,-400.7 J2.4
SW: J1.8 SW1.2 | length 1309.1
  Top Layer w12: J1.8 933.24,-1005.24 933.24,-1601.24 1141.3,-1809.3 SW1.2
VBAT: J2.1 J2.2 P1.1 Q1.1 Q1.2 Q1.5 Q1.6 R3.1
  other v1: 135,-273 179,-273 223,-273 267,-273 311,-273 135,-223 179,-223 223,-223 267,-223 311,-223 400,27 444,27 488,27 532,27 576,27 400,77 444,77 488,77 532,77 576,77
Vcharge+: P4.1 Q1.4 R2.1 R4.1 U5.5
  other v1: 35,-703 79,-703 123,-703 167,-703 35,-653 79,-653 123,-653 167,-653
pads on no net: J1.MP1 J1.MP2 J2.3 SW1. SW1.S1 SW1.S2 U4.1

## Polygon pours and split planes (outlines as drawn)
GND on Top Layer "GND_L01_P020" (solid, remove dead copper, pour order 20): 204.87,-1940.69 94.44,-1742.51 cw(c146.03,-1713.76) 86.97,-1713.76 86.97,-1564.54 cw(c146.02,-1564.54) 132.57,-1507.04 ccw(c72.05,-1248.28) 95.21,-983.54 72.05,-982.52 -78.47,-982.52 cw(c-78.47,-943.15) -117.84,-943.15 -117.84,-0.15 cw(c0.27,-0.14) -10.03,117.52 0.27,117.96 1521.79,117.96 cw(c1521.8,-0.15) 1639.46,10.15 1639.9,-0.15 1639.9,-943.15 cw(c1600.53,-943.15) 1603.97,-982.37 1600.53,-982.52 1450.01,-982.52 ccw(c1450.01,-1248.27) 1389.49,-1507.04 cw(c1376.04,-1564.54) 1435.09,-1564.54 1435.09,-1713.76 cw(c1376.03,-1713.76) 1427.62,-1742.51 1317.19,-1940.69 ccw(c1351.56,-1959.88) 1314.38,-1946.95 1313.4,-1950.24 1312.71,-1953.6 1312.52,-1954.94 cw(c1234.4,-1945.12) 1238.29,-2023.76 1234.39,-2023.86 287.67,-2023.86 cw(c287.67,-1945.12) 211.61,-1965.5 210.12,-1958.8 209.54,-1954.94 208.1,-1948.23 206.94,-1945 205.51,-1941.88
Vcharge+ on Top Layer "VCHARGE+_L01_P021" (solid, remove dead copper, pour order 21): 191,-720 191,-536 -4,-536 -4,-400 -43,-400 -43,-507 -114,-507 -114,-720 -113,-720
GND on Bottom Layer "GND_L02_P019" (solid, remove dead copper, pour order 19): 204.87,-1940.69 94.44,-1742.51 cw(c146.03,-1713.76) 86.97,-1713.76 86.97,-1564.54 cw(c146.02,-1564.54) 132.57,-1507.04 ccw(c72.05,-1248.28) 95.21,-983.54 72.05,-982.52 -78.47,-982.52 cw(c-78.47,-943.15) -117.84,-943.15 -117.84,-0.15 cw(c0.27,-0.14) -10.03,117.52 0.27,117.96 1521.79,117.96 cw(c1521.8,-0.15) 1639.46,10.15 1639.9,-0.15 1639.9,-943.15 cw(c1600.53,-943.15) 1603.97,-982.37 1600.53,-982.52 1450.01,-982.52 ccw(c1450.01,-1248.27) 1389.49,-1507.04 cw(c1376.04,-1564.54) 1435.09,-1564.54 1435.09,-1713.76 cw(c1376.03,-1713.76) 1427.62,-1742.51 1317.19,-1940.69 ccw(c1351.56,-1959.88) 1314.38,-1946.95 1313.4,-1950.24 1312.71,-1953.6 1312.52,-1954.94 cw(c1234.4,-1945.12) 1238.29,-2023.76 1234.39,-2023.86 287.67,-2023.86 cw(c287.67,-1945.12) 211.61,-1965.5 210.12,-1958.8 209.54,-1954.94 208.1,-1948.23 206.94,-1945 205.51,-1941.88

## Keep-outs
Keep-Out Layer:
  lines w6: -117.84,-0.15 cw(c0.27,-0.14) -10.03,117.52 0.27,117.96

## Other copper
Top Layer:
  rectangle net VBAT: 3,-302 129,-240
  rectangle net VBAT: 3,-430 108,-240
  rectangle net +Vref: 14,-524 71,-508
  rectangle net GPIO18: 346,-564 370,-536
  rectangle net GPIO18: 346,-539 433,-497
  rectangle net VBAT: 109,-302 614,106
  rectangle net +5V_ESC: 650.5,-1641 670.5,-1555
  rectangle net +5V_ESC: 455.5,-1641 475.5,-1555
  rectangle net +5V_ESC: 260,-1641 280,-1555
  rectangle net +5V_ESC: 843,-1644 863,-1624
  rectangle net NetP2_1: 349,-1159 593,-887
Bottom Layer:
  rectangle net Vcharge+: -110,-719 191,-536
  rectangle net VBAT: 109,-302 614,106
  rectangle net +5V_ESC: 255,-1577 869,-1531
  rectangle net NetP2_1: 348,-1364 594,-887

## Silkscreen, mask and mechanical layers (free items; w line width, h text height)
Top Overlay:
  drawing of 1844 lines, arcs and shapes, not listed
  text "+VE" at 240.7,-208.25 h70
  text "-VE" at 1162.98,-210 h70
  text "VCHG_+" at 7,-644 h70
  text "GND" at 1,-853.5 h70
  text "SPSU" at 599.45,-972.17 h85
  text "CHG_+" at 200,-974 h70
  text ">VERSION_6.0.0" at 358.27,-1344.14 h62.5
Board_Outline:
  the board outline again, w6
Fabrication:
  drawing of 191 lines, arcs and shapes, not listed
  text "Layer" at 3100.58,-1286 h60
  text "Name" at 3510.49,-1286 h60
  text "Material" at 4440.23,-1286 h60
  text "Thickness" at 5300,-1286 h60
  text "Constant" at 5949.84,-1286 h60
  text "Board Layer Stack" at 6519.7,-1286 h60
  text "Top Overlay" at 3510.49,-1406 h60
  text "Top Solder" at 3510.49,-1526 h60
  text "Solder Resist" at 4440.23,-1526 h60
  text "0.39mil" at 5300,-1526 h60
  text "3.5" at 5949.84,-1526 h60
  text "1" at 3100.58,-1646 h60
  text "Top Layer" at 3510.49,-1646 h60
  text "1.38mil" at 5300,-1646 h60
  text "Dielectric 1" at 3510.49,-1766 h60
  text "FR-4" at 4440.23,-1766 h60
  text "59.06mil" at 5300,-1766 h60
  text "4.8" at 5949.84,-1766 h60
  text "2" at 3100.58,-1886 h60
  text "Bottom Layer" at 3510.49,-1886 h60
  text "1.38mil" at 5300,-1886 h60
  text "Bottom Solder" at 3510.49,-2006 h60
  text "Solder Resist" at 4440.23,-2006 h60
  text "0.39mil" at 5300,-2006 h60
  text "3.5" at 5949.84,-2006 h60
  text "Bottom Overlay" at 3510.49,-2126 h60
  text "Total board thickness:" at 3100.58,-2246 h60
  text "62.60mil" at 5300,-2246 h60
Drill Drawing:
  circle w10: c3139.63,-339.17 r33.33
  lines w10: 3106.29,-755.83 3172.96,-755.83 3139.63,-822.5 3106.29,-755.83 ; 3106.29,-655.83 3122.96,-655.83 3122.96,-672.5 3156.29,-672.5 3156.29,-655.83 3172.96,-655.83 3172.96,-622.5 3156.29,-622.5 3156.29,-605.83 3122.96,-605.83 3122.96,-622.5 3106.29,-622.5 3106.29,-655.83 ; 3106.29,-522.5 3172.96,-522.5 3172.96,-455.83 3106.29,-455.83 3106.29,-522.5 ; 3106.29,-155.83 3172.96,-155.83 3139.63,-222.5 3106.29,-155.83 ; 3106.29,-72.5 3106.29,-55.83 3122.96,-39.17 3106.29,-22.5 3106.29,-5.83 3122.96,-5.83 3139.63,-22.5 3156.29,-5.83 3172.96,-5.83 3172.96,-22.5 3156.29,-39.17 3172.96,-55.83 3172.96,-72.5 3156.29,-72.5 3139.63,-55.83 3122.96,-72.5 3106.29,-72.5 ; 3106.29,110.83 3139.63,77.5 3172.96,110.83 3139.63,144.17 3106.29,110.83 ; 3106.29,244.17 3122.96,244.17 3139.63,227.5 3156.29,244.17 3172.96,244.17 3156.29,260.83 3172.96,277.5 3156.29,277.5 3139.63,294.17 3122.96,277.5 3106.29,277.5 3122.96,260.83 3106.29,244.17 ; 3106.29,377.5 3172.96,377.5 3172.96,444.17 3106.29,444.17 3106.29,377.5 ; 3119.63,-769.17 3159.63,-769.17 3139.63,-809.17 3119.63,-769.17 ; 3119.63,390.83 3159.63,390.83 3159.63,430.83 3119.63,430.83 3119.63,390.83
  lines w15: 3046.5,-867.5 15920.9,-867.5 ; 3046.5,482.5 15920.9,482.5 ; 3597.38,-1017.5 3597.38,632.5 ; 4197.22,-1017.5 4197.22,632.5 ; 5316.89,-1017.5 5316.89,632.5 ; 5822.77,-1017.5 5822.77,632.5 ; 6556.57,-1017.5 6556.57,632.5 ; 8056.12,-1017.5 8056.12,632.5 ; 8645.97,-1017.5 8645.97,632.5 ; 9391.77,-1017.5 9391.77,632.5 ; 10131.56,-1017.5 10131.56,632.5 ; 10985.32,-1017.5 10985.32,632.5 ; 12318.93,-1017.5 12318.93,632.5 ; 13652.54,-1017.5 13652.54,632.5 ; 14518.3,-1017.5 14518.3,632.5 ; 3046.5,-1017.5 15920.9,-1017.5 15920.9,632.5 3046.5,632.5 3046.5,-1017.5
  text "Symbol" at 3136.5,527.5 h72
  text "Count" at 3642.38,527.5 h72
  text "Hole Size" at 4242.22,527.5 h72
  text "Plated" at 5361.89,527.5 h72
  text "Hole Type" at 5867.77,527.5 h72
  text "Drill Layer Pair" at 6601.57,527.5 h72
  text "Via/Pad" at 8101.12,527.5 h72
  text "Pad Shape" at 8690.97,527.5 h72
  text "Template" at 9436.77,527.5 h72
  text "Description" at 10176.56,527.5 h72
  text "Hole Tolerance (+)" at 11030.32,527.5 h72
  text "Hole Tolerance (-)" at 12363.93,527.5 h72
  text "Hole Length" at 13697.54,527.5 h72
  text "Routed Path Length" at 14563.3,527.5 h72
  text "1" at 3642.38,377.5 h60
  text "118.11mil (3.000mm)" at 4242.22,377.5 h60
  text "NPTH" at 5361.89,377.5 h60
  text "Round" at 5867.77,377.5 h60
  text "Top Layer - Bottom Layer" at 6601.57,377.5 h60
  text "Pad" at 8101.12,377.5 h60
  text "Rounded" at 8690.97,377.5 h60
  text "c300hn300" at 9436.77,377.5 h60
  text "-" at 13697.54,377.5 h60
  text "-" at 14563.3,377.5 h60
  text "2" at 3642.38,227.5 h60
  text "35.43mil (0.900mm)" at 4242.22,227.5 h60
  text "NPTH" at 5361.89,227.5 h60
  text "Round" at 5867.77,227.5 h60
  text "Top Layer - Bottom Layer" at 6601.57,227.5 h60
  text "Pad" at 8101.12,227.5 h60
  text "Rounded" at 8690.97,227.5 h60
  text "c0hn90" at 9436.77,227.5 h60
  text "-" at 13697.54,227.5 h60
  text "-" at 14563.3,227.5 h60
  text "2" at 3642.38,77.5 h60
  text "60.00mil (1.524mm)" at 4242.22,77.5 h60
  text "NPTH" at 5361.89,77.5 h60
  text "Round" at 5867.77,77.5 h60
  text "Top Layer - Bottom Layer" at 6601.57,77.5 h60
  text "Pad" at 8101.12,77.5 h60
  text "Rounded" at 8690.97,77.5 h60
  text "c152hn152" at 9436.77,77.5 h60
  text "-" at 13697.54,77.5 h60
  text "-" at 14563.3,77.5 h60
  text "2" at 3642.38,-72.5 h60
  text "78.74mil (2.000mm)" at 4242.22,-72.5 h60
  text "NPTH" at 5361.89,-72.5 h60
  text "Round" at 5867.77,-72.5 h60
  text "Top Layer - Bottom Layer" at 6601.57,-72.5 h60
  text "Pad" at 8101.12,-72.5 h60
  text "Rounded" at 8690.97,-72.5 h60
  text "c200hn200" at 9436.77,-72.5 h60
  text "-" at 13697.54,-72.5 h60
  text "-" at 14563.3,-72.5 h60
  text "2" at 3642.38,-222.5 h60
  text "118.11mil (3.000mm)" at 4242.22,-222.5 h60
  text "PTH" at 5361.89,-222.5 h60
  text "Round" at 5867.77,-222.5 h60
  text "Top Layer - Bottom Layer" at 6601.57,-222.5 h60
  text "Pad" at 8101.12,-222.5 h60
  text "Rectangle" at 8690.97,-222.5 h60
  text "s645h300" at 9436.77,-222.5 h60
  text "-" at 13697.54,-222.5 h60
  text "-" at 14563.3,-222.5 h60
  text "3" at 3642.38,-372.5 h60
  text "40.00mil (1.016mm)" at 4242.22,-372.5 h60
  text "PTH" at 5361.89,-372.5 h60
  text "Round" at 5867.77,-372.5 h60
  text "Top Layer - Bottom Layer" at 6601.57,-372.5 h60
  text "Pad" at 8101.12,-372.5 h60
  text "Octagonal" at 8690.97,-372.5 h60
  text "s254h102c50" at 9436.77,-372.5 h60
  text "-" at 13697.54,-372.5 h60
  text "-" at 14563.3,-372.5 h60
  text "7" at 3642.38,-522.5 h60
  text "35.43mil (0.900mm)" at 4242.22,-522.5 h60
  text "PTH" at 5361.89,-522.5 h60
  text "Round" at 5867.77,-522.5 h60
  text "Top Layer - Bottom Layer" at 6601.57,-522.5 h60
  text "Pad" at 8101.12,-522.5 h60
  text "(Mixed)" at 8690.97,-522.5 h60
  text "(Mixed)" at 9436.77,-522.5 h60
  text "-" at 13697.54,-522.5 h60
  text "-" at 14563.3,-522.5 h60
  text "8" at 3642.38,-672.5 h60
  text "75.98mil (1.930mm)" at 4242.22,-672.5 h60
  text "NPTH" at 5361.89,-672.5 h60
  text "Round" at 5867.77,-672.5 h60
  text "Top Layer - Bottom Layer" at 6601.57,-672.5 h60
  text "Pad" at 8101.12,-672.5 h60
  text "Rounded" at 8690.97,-672.5 h60
  text "c193hn193" at 9436.77,-672.5 h60
  text "-" at 13697.54,-672.5 h60
  text "-" at 14563.3,-672.5 h60
  text "208" at 3642.38,-822.5 h60
  text "11.81mil (0.300mm)" at 4242.22,-822.5 h60
  text "PTH" at 5361.89,-822.5 h60
  text "Round" at 5867.77,-822.5 h60
  text "Top Layer - Bottom Layer" at 6601.57,-822.5 h60
  text "Via" at 8101.12,-822.5 h60
  text "Rounded" at 8690.97,-822.5 h60
  text "(Mixed)" at 9436.77,-822.5 h60
  text "-" at 13697.54,-822.5 h60
  text "-" at 14563.3,-822.5 h60
  text "235 Total" at 3642.38,-972.5 h60

## Dimensions
1521.79,117.96 to 1146.27,-2027.14 on Dimension
206.94,-1945 to 1312.52,-1954.94 on Dimension
-117.84,-0.15 to 1639.9,-0.15 on Dimension